# Altium PCB CH32V4x7V-R0.PcbDoc (part 2 of 3)
Units mm, origin at the board's own origin, x right, y up, seen from the top; angles counter-clockwise.
Board outline 106.4 x 69.09 mm, 2 copper layers (Top Layer, Bottom Layer); 78 components, 117 nets, 431 pads, 740 vias.
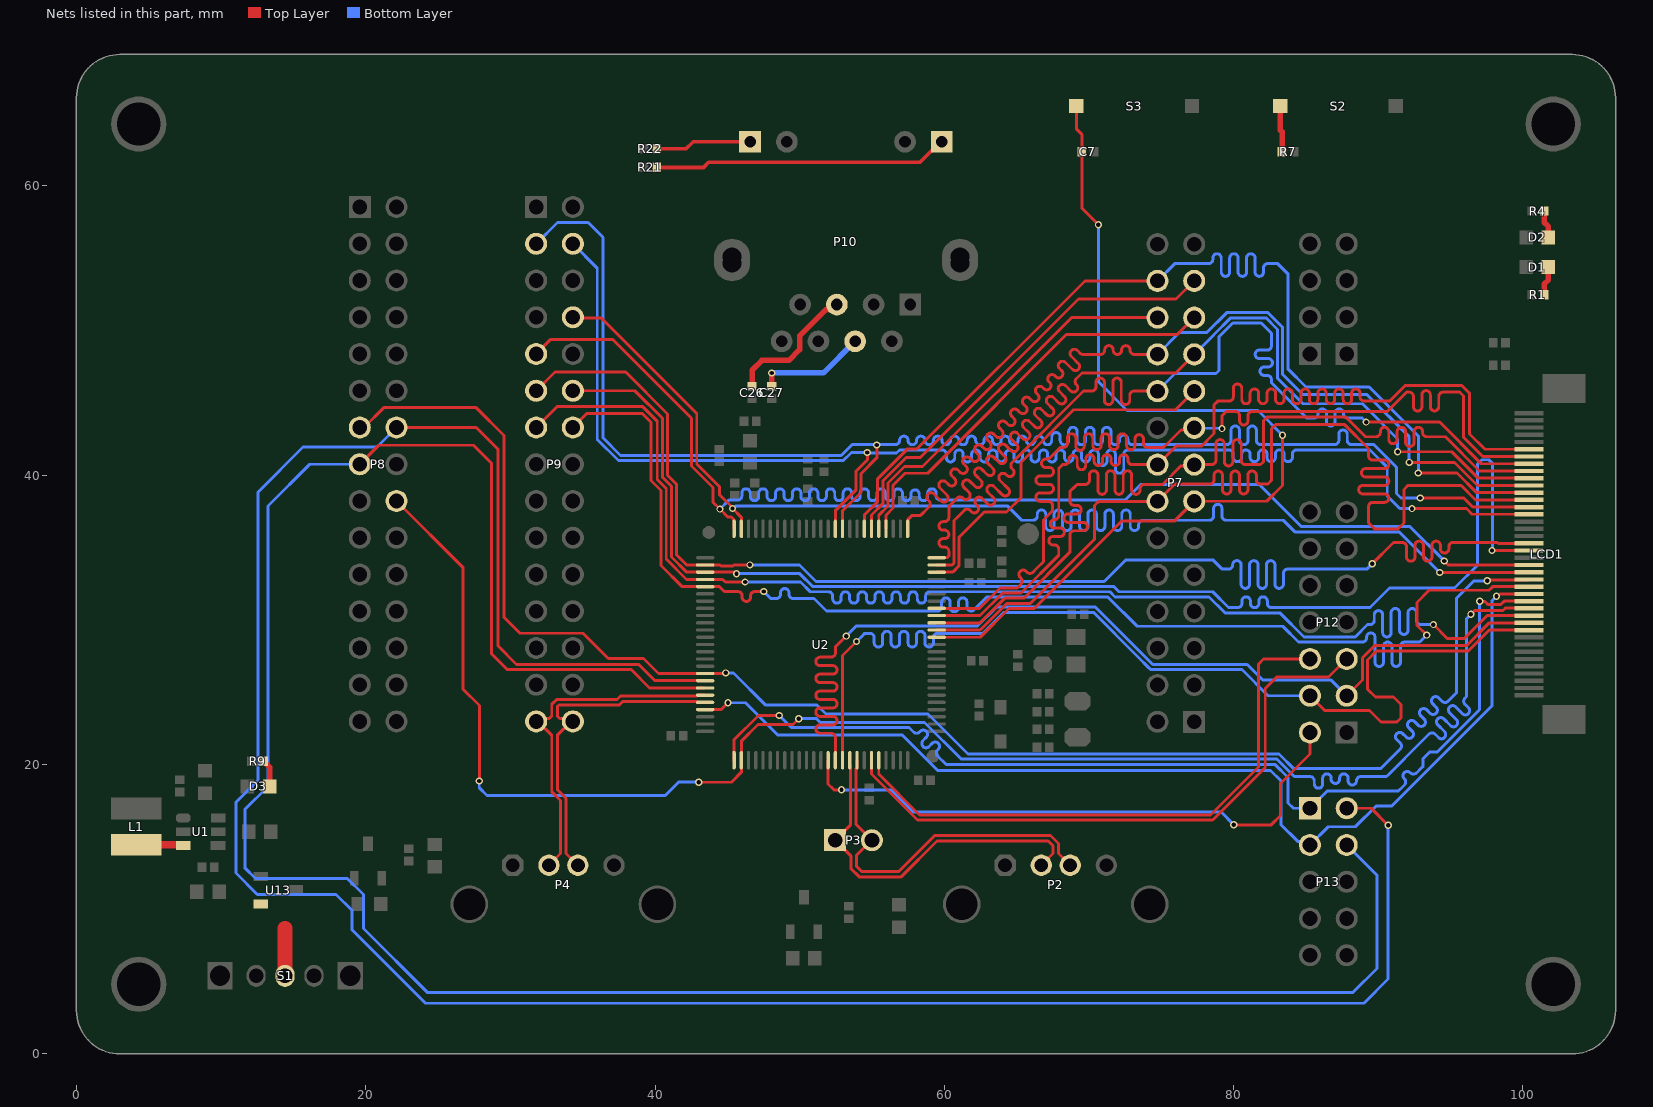
[diagram p2: the nets of this part, all layers, seen from the top]

## Via types
v1: diameter 0.5, hole 0.3, Top Layer to Bottom Layer, tented both sides, 735 vias
v2: diameter 0.7, hole 0.4, Top Layer to Bottom Layer, tented both sides, 5 vias

## Nets (pads, with @x,y where several pads share a name; then routed paths per layer and width w, separated by ;. In a path a pad name is that pad's centre, name@x,y a point inside that pad or via, vN(x,y) a via of type N, cw(c..) or ccw(c..) an arc to the next point about the centre after c; other vN are vias at no path point) (continued)
NetC26_2: C26.2 P10.5 | length 9.4
  Top Layer w0.381: C26.2@46.702,46.143 46.702,47.257 47.378,47.934 49.246,47.934 49.995,48.682 49.995,49.635 51.809,51.45 51.911,51.45 52.262,51.801 P10.5@52.565,51.801
NetC27_2: C27.2 P10.4 | length 7.6
  Top Layer w0.381: C27.2@48.055,46.143 48.055,47.064 v1(48.061,47.07)
  Bottom Layer w0.381: v1(48.061,47.07) 51.644,47.07 P10.4@53.835,49.261
NetD1_1: D1.1 R1.2 | length 2
  Top Layer w0.381: R1.2@101.463,52.477 101.463,53.21 101.758,53.506 D1.1@101.758,54.392
NetD2_1: D2.1 R4.2 | length 1.9
  Top Layer w0.381: R4.2@101.463,58.264 101.463,57.49 101.758,57.194 D2.1@101.758,56.437
NetD3_2: D3.2 R9.1 | length 1.9
  Top Layer w0.381: R9.1@12.958,20.238 12.958,20.213 13.35,19.821 D3.2@13.35,18.492
NetL1_1: L1.1 U1.3 | length 3.5
  Top Layer w0.508: L1.1@4.13,14.895 4.577,14.448 7.348,14.448 U1.3@7.394,14.402
NetP10_9: P10.9 R21.2 | length 20.6
  Top Layer w0.254: R21.2@40.004,61.278 43.353,61.278 43.703,61.628 58.312,61.628 59.114,62.43 59.197,62.43 59.762,62.995 P10.9@59.762,63.078
NetP10_12: P10.12 R22.2 | length 7
  Top Layer w0.254: R22.2@40.108,62.562 42.147,62.562 42.638,63.053 P10.12@46.57,63.053 P10.12@46.325,62.808
NetR7_2: R7.2 S2.2 | length 3.2
  Top Layer w0.381: S2.2@83.216,65.525 83.216,63.858 83.342,63.732 R7.2@83.342,62.35
NetS1_1: S1.1 U13.2 | length 3.3
  Top Layer w1.016: S1.1@14.421,5.392 14.421,8.678
NRST: C7.2 P7.13 S3.2 U2.14 | length 65.7
  Top Layer w0.203: U2.14@59.464,28.798 62.479,28.798 64.472,30.791 66.217,30.791 72.276,36.85 75.928,36.85 77.279,38.202 82.291,38.202 83.377,39.287 v1(83.377,42.771) ; S3.2@69.119,65.525 69.119,63.949 69.499,63.569 C7.2@69.499,62.35 69.525,62.325 69.525,58.432 v1(70.648,57.309)
  Bottom Layer w0.203: v1(70.648,57.309) 70.648,46.459 72.632,44.475 81.672,44.475 v1(83.377,42.771)
PA0: P7.19 U2.23 | length 25.6
  Top Layer w0.203: U2.23@59.464,33.298 60.576,33.298 61.018,33.74 61.018,35.713 62.755,37.45 64.301,37.45 65.296,38.445 65.296,39.99 65.296,40.89 68.931,44.525 75.982,44.525 P7.19@77.272,45.815
PA1: LCD1.33 P7.20 U2.24 | length 74.5
  Top Layer w0.203: U2.24@59.464,33.798 60.539,33.798 60.663,33.922 60.663,36.862 60.886,37.086 61.371,37.571 cw(c61.578,37.364) 61.784,37.571 61.872,37.483 ccw(c62.079,37.689) 62.285,37.483 ccw(c62.079,37.689) 62.285,37.896 62.197,37.984 cw(c62.404,38.19) 62.197,38.397 cw(c62.404,38.19) 62.611,38.397 62.995,38.012 ccw(c63.202,38.218) 63.409,38.012 ccw(c63.202,38.218) 63.409,38.425 63.024,38.81 cw(c63.23,39.016) 63.024,39.223 cw(c63.23,39.016) 63.437,39.223 64.004,38.655 ccw(c64.211,38.862) 64.417,38.655 ccw(c64.211,38.862) 64.417,39.069 63.85,39.636 cw(c64.056,39.843) 63.85,40.049 cw(c64.056,39.843) 64.263,40.049 64.32,39.992 ccw(c64.527,40.198) 64.733,39.992 ccw(c64.527,40.198) 64.733,40.405 64.676,40.462 cw(c64.883,40.669) 64.676,40.875 65.081,41.28 69.615,45.815 70.084,45.815 70.185,45.815 ccw(c70.185,46.107) 70.477,46.107 70.477,46.425 cw(c70.769,46.425) 71.061,46.425 71.061,45.173 ccw(c71.354,45.173) 71.646,45.173 71.646,46.425 cw(c71.938,46.425) 72.23,46.425 72.23,45.173 ccw(c72.522,45.173) 72.814,45.173 72.814,45.523 cw(c73.106,45.523) 73.106,45.815 P7.20@74.732,45.815 ; v1(89.154,43.672) 94.24,43.672 97.116,40.795 LCD1.33@100.428,40.795
  Bottom Layer w0.203: P7.20@74.732,45.815 75.953,47.036 78.784,47.036 78.992,47.244 78.992,49.577 79.939,50.524 81.9,50.524 82.612,49.812 82.612,49.63 82.612,48.944 cw(c82.32,48.944) 82.32,48.652 81.779,48.652 ccw(c81.779,48.36) 81.779,48.067 82.386,48.067 cw(c82.386,47.775) 82.386,47.483 82.112,47.483 ccw(c82.112,47.191) 82.112,46.899 82.32,46.899 cw(c82.32,46.607) 82.612,46.607 82.612,46.391 83.255,45.748 85.049,43.954 85.439,43.954 85.54,43.954 ccw(c85.54,44.246) 85.832,44.246 85.832,44.293 cw(c86.124,44.293) 86.417,44.293 86.417,43.694 ccw(c86.709,43.694) 87.001,43.694 87.001,44.293 cw(c87.293,44.293) 87.585,44.293 87.585,44.246 ccw(c87.877,44.246) 87.877,43.954 88.887,43.954 88.914,43.927 89.154,43.687 v1(89.154,43.672)
PA2: LCD1.31 P7.21 U2.25 | length 74.5
  Top Layer w0.203: U2.25@59.464,34.298 60.188,34.298 60.307,34.417 60.307,34.641 60.307,34.743 ccw(c60.015,34.743) 60.015,35.035 59.913,35.035 cw(c59.913,35.327) 59.913,35.619 60.015,35.619 ccw(c60.015,35.911) 60.015,36.203 59.913,36.203 cw(c59.913,36.495) 59.913,36.787 60.015,36.787 ccw(c60.015,37.079) 60.307,37.079 60.307,37.633 60.307,37.858 60.38,37.931 60.865,38.416 cw(c61.072,38.21) 61.278,38.416 61.29,38.405 ccw(c61.496,38.611) 61.703,38.405 ccw(c61.496,38.611) 61.703,38.818 61.346,39.175 cw(c61.553,39.381) 61.346,39.588 cw(c61.553,39.381) 61.759,39.588 62.116,39.231 ccw(c62.322,39.438) 62.529,39.231 ccw(c62.322,39.438) 62.529,39.644 62.172,40.001 cw(c62.379,40.207) 62.172,40.414 cw(c62.379,40.207) 62.585,40.414 62.942,40.057 ccw(c63.149,40.264) 63.355,40.057 ccw(c63.149,40.264) 63.355,40.47 62.999,40.827 cw(c63.205,41.033) 62.999,41.24 cw(c63.205,41.033) 63.412,41.24 63.768,40.883 ccw(c63.975,41.09) 64.181,40.883 ccw(c63.975,41.09) 64.181,41.297 63.825,41.653 cw(c64.031,41.86) 63.825,42.066 cw(c64.031,41.86) 64.238,42.066 64.594,41.71 ccw(c64.801,41.916) 65.007,41.71 ccw(c64.801,41.916) 65.007,42.123 64.651,42.479 cw(c64.857,42.686) 64.651,42.892 cw(c64.857,42.686) 65.064,42.892 65.421,42.536 ccw(c65.627,42.742) 65.834,42.536 ccw(c65.627,42.742) 65.834,42.949 65.477,43.305 cw(c65.684,43.512) 65.477,43.719 cw(c65.684,43.512) 65.89,43.719 66.247,43.362 ccw(c66.453,43.569) 66.66,43.362 ccw(c66.453,43.569) 66.66,43.775 66.303,44.132 cw(c66.51,44.338) 66.303,44.545 cw(c66.51,44.338) 66.716,44.545 67.073,44.188 ccw(c67.279,44.395) 67.486,44.188 ccw(c67.279,44.395) 67.486,44.601 67.129,44.958 cw(c67.336,45.164) 67.129,45.371 cw(c67.336,45.164) 67.543,45.371 67.899,45.014 ccw(c68.106,45.221) 68.312,45.014 ccw(c68.106,45.221) 68.312,45.427 67.956,45.784 cw(c68.162,45.991) 67.956,46.197 cw(c68.162,45.991) 68.369,46.197 68.725,45.841 ccw(c68.932,46.047) 69.138,45.841 ccw(c68.932,46.047) 69.138,46.254 69.127,46.265 cw(c69.334,46.471) 69.127,46.678 69.522,47.073 70.046,47.073 75.99,47.073 P7.21@77.272,48.355 ; v1(91.333,41.624) 95.079,41.624 96.908,39.795 LCD1.31@100.428,39.795
  Bottom Layer w0.203: P7.21@77.272,48.355 78.637,49.72 78.637,49.725 79.792,50.88 82.228,50.88 83.034,50.074 83.034,46.7 84.793,44.941 88.896,44.941 91.333,42.504 v1(91.333,41.624)
PA3: LCD1.30 P7.22 U2.26 | length 74.4
  Top Layer w0.203: U2.26@57.464,36.298 57.469,36.303 57.469,36.925 57.774,37.23 58.36,37.23 58.868,37.738 58.94,37.81 ccw(c58.734,38.016) 58.94,38.223 58.867,38.296 cw(c59.073,38.503) 58.867,38.709 cw(c59.073,38.503) 59.28,38.709 59.761,38.228 ccw(c59.968,38.435) 60.174,38.228 ccw(c59.968,38.435) 60.174,38.641 59.697,39.119 cw(c59.903,39.325) 59.697,39.532 cw(c59.903,39.325) 60.11,39.532 60.297,39.344 ccw(c60.504,39.551) 60.71,39.344 ccw(c60.504,39.551) 60.71,39.757 60.523,39.945 cw(c60.729,40.152) 60.523,40.358 cw(c60.729,40.152) 60.936,40.358 61.087,40.207 ccw(c61.293,40.414) 61.5,40.207 ccw(c61.293,40.414) 61.5,40.62 61.349,40.771 cw(c61.556,40.978) 61.349,41.184 cw(c61.556,40.978) 61.762,41.184 61.913,41.033 ccw(c62.119,41.24) 62.326,41.033 ccw(c62.119,41.24) 62.326,41.447 62.175,41.597 cw(c62.382,41.804) 62.175,42.01 cw(c62.382,41.804) 62.588,42.01 62.739,41.86 ccw(c62.946,42.066) 63.152,41.86 ccw(c62.946,42.066) 63.152,42.273 63.001,42.424 cw(c63.208,42.63) 63.001,42.837 cw(c63.208,42.63) 63.414,42.837 63.565,42.686 ccw(c63.772,42.892) 63.978,42.686 ccw(c63.772,42.892) 63.978,43.099 63.828,43.25 cw(c64.034,43.456) 63.828,43.663 cw(c64.034,43.456) 64.241,43.663 64.391,43.512 ccw(c64.598,43.719) 64.805,43.512 ccw(c64.598,43.719) 64.805,43.925 64.654,44.076 cw(c64.86,44.282) 64.654,44.489 cw(c64.86,44.282) 65.067,44.489 65.218,44.338 ccw(c65.424,44.545) 65.631,44.338 ccw(c65.424,44.545) 65.631,44.751 65.48,44.902 cw(c65.686,45.109) 65.48,45.315 cw(c65.686,45.109) 65.893,45.315 66.044,45.164 ccw(c66.25,45.371) 66.457,45.164 ccw(c66.25,45.371) 66.457,45.577 66.384,45.65 cw(c66.591,45.857) 66.384,46.063 cw(c66.591,45.857) 66.797,46.063 66.87,45.991 ccw(c67.077,46.197) 67.283,45.991 ccw(c67.077,46.197) 67.283,46.404 67.23,46.457 cw(c67.437,46.663) 67.23,46.87 cw(c67.437,46.663) 67.643,46.87 67.696,46.817 ccw(c67.903,47.023) 68.109,46.817 ccw(c67.903,47.023) 68.109,47.23 67.955,47.384 cw(c68.161,47.591) 67.955,47.797 cw(c68.161,47.591) 68.368,47.797 68.849,47.316 ccw(c69.056,47.523) 69.262,47.316 ccw(c69.056,47.523) 69.262,47.729 68.781,48.21 cw(c68.988,48.417) 68.781,48.623 cw(c68.988,48.417) 69.194,48.623 69.378,48.44 ccw(c69.584,48.647) 69.584,48.355 70.485,48.355 70.691,48.355 70.793,48.355 ccw(c70.793,48.647) 71.085,48.647 71.085,48.67 cw(c71.377,48.67) 71.669,48.67 71.669,48.645 ccw(c71.961,48.645) 72.253,48.645 72.253,48.67 cw(c72.545,48.67) 72.837,48.67 72.837,48.647 ccw(c73.13,48.647) 73.13,48.355 73.654,48.355 P7.22@74.732,48.355 ; v1(92.131,40.889) 95.265,40.889 96.859,39.295 LCD1.30@100.428,39.295
  Bottom Layer w0.203: P7.22@74.732,48.355 76.256,49.879 78.162,49.879 79.519,51.235 82.375,51.235 83.39,50.221 83.39,46.968 84.772,45.586 89.198,45.586 92.131,42.653 v1(92.131,40.889)
PA4: P7.23 U2.29 | length 28.8
  Top Layer w0.203: U2.29@55.964,36.298 55.964,37.237 56.456,37.729 56.456,39.312 57.282,40.138 58.845,40.138 68.429,49.723 76.1,49.723 P7.23@77.272,50.895
PA5: P7.24 U2.30 | length 26.8
  Top Layer w0.203: U2.30@55.464,36.298 55.464,37.24 56.101,37.876 56.101,39.459 57.25,40.609 58.497,40.609 68.782,50.895 P7.24@74.732,50.895
PA6: P7.25 U2.31 | length 30.9
  Top Layer w0.203: U2.31@54.96,36.293 U2.31@54.964,36.298 54.964,37.243 55.745,38.023 55.745,39.607 57.355,41.216 58.309,41.216 69.268,52.176 76.013,52.176 P7.25@77.272,53.435
PA7: LCD1.29 P7.26 U2.32 | length 74.6
  Top Layer w0.203: U2.32@54.464,36.298 54.464,37.246 55.39,38.171 55.39,39.754 57.435,41.799 58.078,41.799 69.713,53.435 P7.26@74.732,53.435 ; v1(92.766,40.154) 95.444,40.154 96.803,38.795 LCD1.29@100.428,38.795
  Bottom Layer w0.203: P7.26@74.732,53.435 75.924,54.627 78.163,54.627 78.265,54.627 ccw(c78.265,54.919) 78.557,54.919 78.557,55.02 cw(c78.849,55.02) 79.141,55.02 79.141,54.043 ccw(c79.433,54.043) 79.725,54.043 79.725,55.02 cw(c80.018,55.02) 80.31,55.02 80.31,54.043 ccw(c80.602,54.043) 80.894,54.043 80.894,55.02 cw(c81.186,55.02) 81.478,55.02 81.478,54.043 ccw(c81.77,54.043) 82.062,54.043 82.062,54.335 cw(c82.354,54.335) 82.354,54.627 82.876,54.627 83.048,54.627 83.745,53.929 83.745,47.354 84.993,46.106 89.368,46.106 92.766,42.708 v1(92.766,40.154)
PA8: LCD1.17 P8.13 U2.67 | length 113.8
  Top Layer w0.203: P8.13@19.588,43.3 19.884,43.3 21.252,44.668 27.634,44.668 29.558,42.744 29.558,30.18 30.663,29.076 35.025,29.076 36.768,27.333 39.207,27.333 40.242,26.298 U2.67@43.464,26.298 43.469,26.303 44.855,26.303 v1(44.889,26.337) ; v1(97.527,32.703) 97.573,32.749 100.382,32.749 LCD1.17@100.428,32.795
  Bottom Layer w0.203: v1@44.889,26.33 45.431,26.33 47.658,24.103 51.2,24.103 51.812,23.491 58.871,23.491 61.636,20.726 83.14,20.726 84.155,19.712 90.157,19.712 91.443,20.998 91.515,21.07 ccw(c91.309,21.276) 91.515,21.483 91.276,21.722 cw(c91.482,21.929) 91.276,22.135 cw(c91.482,21.929) 91.689,22.135 91.928,21.896 ccw(c92.135,22.103) 92.341,21.896 ccw(c92.135,22.103) 92.341,22.309 92.102,22.548 cw(c92.308,22.755) 92.102,22.962 cw(c92.308,22.755) 92.515,22.962 92.754,22.722 ccw(c92.961,22.929) 93.167,22.722 ccw(c92.961,22.929) 93.167,23.135 92.928,23.375 cw(c93.135,23.581) 92.928,23.788 cw(c93.135,23.581) 93.341,23.788 93.581,23.548 ccw(c93.787,23.755) 93.994,23.548 ccw(c93.787,23.755) 93.994,23.962 93.754,24.201 cw(c93.961,24.407) 93.754,24.614 cw(c93.961,24.407) 94.167,24.614 94.407,24.375 ccw(c94.613,24.581) 94.82,24.375 95.195,24.75 95.404,24.959 95.404,31.502 96.605,32.703 v1(97.527,32.703)
PA9: P8.14 P13.2 U2.68 | length 173.8
  Top Layer w0.203: P8.14@22.128,43.3 27.634,43.3 29.134,41.8 29.134,28.205 30.422,26.917 38.879,26.917 39.998,25.798 U2.68@43.464,25.798 ; P13.2@87.813,16.978 89.508,16.978 v1(90.678,15.808)
  Bottom Layer w0.203: P8.14@22.128,43.3 20.772,41.943 15.662,41.943 12.549,38.83 12.549,18.919 11.023,17.393 11.023,12.503 12.506,11.019 17.952,11.019 19.044,9.927 19.044,8.577 24.124,3.497 89.008,3.497 90.678,5.167 v1(90.678,15.808)
PA10: P8.15 P13.4 U2.69 | length 165.6
  Top Layer w0.203: P8.15@19.588,40.76 20.903,42.074 27.446,42.074 28.688,40.832 28.688,27.654 29.781,26.561 38.362,26.561 39.625,25.298 U2.69@43.464,25.298
  Bottom Layer w0.203: P8.15@19.588,40.76 16.126,40.76 13.247,37.882 13.247,18.492 11.639,16.883 11.639,12.858 12.372,12.125 18.722,12.125 19.84,11.007 19.84,8.664 24.252,4.253 88.254,4.253 89.899,5.898 89.899,12.353 P13.4@87.813,14.438
PA11: P4.2 P9.29 U2.70 | length 23.8
  Top Layer w0.203: P9.29@31.78,22.98 P9.29@31.904,22.98 ; P4.2@32.662,13.039 33.472,13.849 33.472,17.506 32.86,18.118 32.86,22.024 P9.29@31.904,22.98 ; U2.70@43.464,24.798 42.937,24.798 42.877,24.739 37.603,24.739 37.368,24.503 33.202,24.503 32.86,24.161 32.86,23.351 32.685,23.176 32.325,23.176 32.129,22.98 P9.29@31.904,22.98
PA12: P4.3 P9.30 U2.71 | length 23.2
  Top Layer w0.203: P9.30@34.32,22.98 P9.30@34.197,22.98 ; P4.3@34.662,13.039 33.853,13.849 33.853,17.664 33.241,18.276 33.241,22.024 P9.30@34.197,22.98 ; U2.71@43.464,24.298 42.937,24.298 42.877,24.358 37.761,24.358 37.525,24.122 33.36,24.122 33.241,24.003 33.241,23.351 33.416,23.176 34.002,23.176 P9.30@34.197,22.98
PA13: LCD1.15 P13.3 U2.72 | length 74.5
  Top Layer w0.203: U2.72@43.464,23.798 44.572,23.798 45.044,24.27 v1(45.044,24.273) ; v1(98.17,31.631) 98.25,31.631 98.414,31.795 LCD1.15@100.428,31.795
  Bottom Layer w0.203: v1(45.044,24.273) 46.249,24.273 48.477,22.046 57.089,22.046 59.538,19.597 82.551,19.597 83.257,18.891 83.257,15.855 84.422,14.69 85.021,14.69 P13.3@85.273,14.438 86.534,15.699 88.41,15.699 89.831,17.12 90.913,17.12 97.872,24.078 97.872,31.333 v1(98.17,31.631)
PA14: LCD1.14 P13.1 U2.76 | length 74.4
  Top Layer w0.203: U2.76@45.465,20.298 45.465,21.715 47.143,23.394 v1(48.583,23.394) ; v1(97.003,31.284) 97.015,31.273 97.37,31.273 97.567,31.076 98.483,31.076 98.702,31.295 LCD1.14@100.428,31.295
  Bottom Layer w0.203: v1(48.583,23.394) 49.419,22.557 57.563,22.557 57.803,22.318 57.875,22.246 ccw(c58.081,22.452) 58.288,22.246 58.337,22.295 cw(c58.544,22.089) 58.75,22.295 cw(c58.544,22.089) 58.75,21.882 58.524,21.655 ccw(c58.73,21.449) 58.524,21.242 ccw(c58.73,21.449) 58.937,21.242 59.163,21.469 cw(c59.37,21.262) 59.576,21.469 cw(c59.37,21.262) 59.576,21.056 59.527,21.007 ccw(c59.734,20.8) 59.527,20.594 60.106,20.015 82.846,20.015 83.762,19.099 83.762,17.348 84.131,16.978 P13.1@85.273,16.978 86.462,18.167 91.38,18.167 91.735,18.522 91.807,18.594 ccw(c91.601,18.801) 91.807,19.007 91.789,19.026 cw(c91.995,19.232) 91.789,19.439 cw(c91.995,19.232) 92.202,19.439 92.22,19.42 ccw(c92.427,19.627) 92.633,19.42 92.954,19.741 93.1,19.887 93.1,20.416 93.547,20.864 94.077,20.864 97.003,23.791 v1(97.003,31.284)
PA15: LCD1.13 P8.18 U2.77 | length 116.4
  Top Layer w0.203: P8.18@22.128,38.22 26.711,33.638 26.711,25.226 27.855,24.081 27.855,18.871 v1(27.848,18.863) ; v1(43.027,18.781) 43.031,18.777 45.278,18.777 45.964,19.464 U2.77@45.964,20.298 45.964,21.614 47.121,22.771 49.543,22.771 49.929,23.157 v1(49.929,23.17) ; v1(96.399,30.382) 96.4,30.382 96.666,30.648 98.619,30.648 98.806,30.835 100.388,30.835 LCD1.13@100.428,30.795
  Bottom Layer w0.203: v1(27.848,18.863) 27.848,18.389 28.375,17.862 40.702,17.862 41.621,18.781 v1(43.027,18.781) ; v1(49.929,23.17) 51.17,23.17 51.428,22.913 58.635,22.913 61.178,20.37 82.993,20.37 84.194,19.169 84.592,19.169 85.278,19.169 cw(c85.278,18.877) 85.57,18.877 85.57,18.655 ccw(c85.862,18.655) 86.154,18.655 86.154,19.064 cw(c86.447,19.064) 86.739,19.064 86.739,18.985 ccw(c87.031,18.985) 87.323,18.985 87.323,19.064 cw(c87.615,19.064) 87.907,19.064 87.907,18.877 ccw(c88.199,18.877) 88.491,18.877 cw(c88.783,18.877) 88.783,19.169 90.573,19.169 90.706,19.302 93.023,21.62 93.508,22.105 cw(c93.715,21.898) 93.921,22.105 94.161,21.865 ccw(c94.368,22.071) 94.574,21.865 ccw(c94.368,22.071) 94.574,22.278 94.107,22.746 cw(c94.313,22.952) 94.107,23.159 cw(c94.313,22.952) 94.52,23.159 94.988,22.691 ccw(c95.194,22.897) 95.401,22.691 ccw(c95.194,22.897) 95.401,23.104 94.933,23.572 cw(c95.139,23.778) 94.933,23.985 cw(c95.139,23.778) 95.346,23.985 95.814,23.517 ccw(c96.02,23.724) 96.227,23.517 ccw(c96.02,23.724) 96.227,23.93 95.987,24.17 cw(c96.193,24.377) 95.987,24.583 96.103,24.699 96.103,25.275 96.103,30.086 v1(96.399,30.382)
PB0: LCD1.27 P9.3 U2.35 | length 113.8
  Top Layer w0.203: U2.35@52.964,36.298 52.964,37.546 54.233,38.814 54.233,40.106 55.33,41.203 v1(55.33,42.088) ; v1(92.896,38.425) 95.904,38.425 96.533,37.795 LCD1.27@100.428,37.795
  Bottom Layer w0.203: P9.3@31.78,56 33.254,57.474 35.375,57.474 36.399,56.449 36.399,42.586 37.62,41.365 52.867,41.365 53.632,42.13 55.288,42.13 v1(55.33,42.088) 55.361,42.119 56.515,42.119 56.617,42.119 ccw(c56.617,42.411) 56.909,42.411 56.909,42.413 cw(c57.201,42.413) 57.493,42.413 57.493,42.398 ccw(c57.785,42.398) 58.077,42.398 58.077,42.413 cw(c58.37,42.413) 58.662,42.413 58.662,42.398 ccw(c58.954,42.398) 59.246,42.398 59.246,42.413 cw(c59.538,42.413) 59.83,42.413 59.83,42.398 ccw(c60.122,42.398) 60.414,42.398 60.414,42.413 cw(c60.706,42.413) 60.998,42.413 60.998,42.398 ccw(c61.291,42.398) 61.583,42.398 61.583,42.413 cw(c61.875,42.413) 62.167,42.413 62.167,42.398 ccw(c62.459,42.398) 62.751,42.398 62.751,42.413 cw(c63.043,42.413) 63.335,42.413 63.335,42.398 ccw(c63.627,42.398) 63.919,42.398 63.919,42.413 cw(c64.212,42.413) 64.504,42.413 64.504,42.398 ccw(c64.796,42.398) 65.088,42.398 65.088,42.413 cw(c65.38,42.413) 65.672,42.413 65.672,42.398 ccw(c65.964,42.398) 66.256,42.398 66.256,42.413 cw(c66.548,42.413) 66.84,42.413 66.84,42.398 ccw(c67.133,42.398) 67.425,42.398 67.425,42.664 cw(c67.717,42.664) 68.009,42.664 68.009,42.398 ccw(c68.301,42.398) 68.593,42.398 68.593,43.025 cw(c68.885,43.025) 69.177,43.025 69.177,42.398 ccw(c69.469,42.398) 69.761,42.398 69.761,43.025 cw(c70.054,43.025) 70.346,43.025 70.346,42.398 ccw(c70.638,42.398) 70.93,42.398 70.93,43.025 cw(c71.222,43.025) 71.514,43.025 71.514,42.398 ccw(c71.806,42.398) 72.098,42.398 72.098,42.485 cw(c72.39,42.485) 72.682,42.485 72.682,42.411 ccw(c72.975,42.411) 72.975,42.119 73.9,42.119 79.423,42.119 79.524,42.119 ccw(c79.524,42.411) 79.816,42.411 79.816,43.116 cw(c80.108,43.116) 80.4,43.116 80.4,42.398 ccw(c80.693,42.398) 80.985,42.398 80.985,43.116 cw(c81.277,43.116) 81.569,43.116 81.569,42.411 ccw(c81.861,42.411) 81.861,42.119 84.063,42.119 86.874,42.119 86.976,42.119 ccw(c86.976,42.411) 87.268,42.411 87.268,42.835 cw(c87.56,42.835) 87.852,42.835 87.852,42.411 ccw(c88.144,42.411) 88.144,42.119 89.685,42.119 91.256,40.548 91.256,38.73 91.562,38.425 92.365,38.425 v1(92.896,38.425)
PB1: LCD1.26 P9.4 U2.36 | length 108.2
  Top Layer w0.203: U2.36@52.464,36.298 52.464,37.548 53.877,38.961 53.877,40.253 54.676,41.051 v1(54.676,41.575) ; v1(92.33,37.694) 96.088,37.694 96.479,37.303 100.42,37.303 LCD1.26@100.428,37.295
  Bottom Layer w0.203: P9.4@34.32,56 36.005,54.316 36.005,42.477 37.473,41.009 53.014,41.009 53.58,41.575 v1(54.676,41.575) 54.718,41.533 56.693,41.533 56.911,41.751 59.156,41.751 59.842,41.751 cw(c59.842,41.459) 60.134,41.459 60.134,41.212 ccw(c60.426,41.212) 60.718,41.212 60.718,41.458 cw(c61.01,41.458) 61.302,41.458 61.302,41.212 ccw(c61.594,41.212) 61.886,41.212 61.886,41.458 cw(c62.178,41.458) 62.47,41.458 62.47,41.212 ccw(c62.763,41.212) 63.055,41.212 63.055,41.458 cw(c63.347,41.458) 63.639,41.458 63.639,41.212 ccw(c63.931,41.212) 64.223,41.212 64.223,41.458 cw(c64.515,41.458) 64.807,41.458 64.807,41.212 ccw(c65.099,41.212) 65.391,41.212 65.391,41.458 cw(c65.684,41.458) 65.976,41.458 65.976,41.212 ccw(c66.268,41.212) 66.56,41.212 66.56,41.458 cw(c66.852,41.458) 67.144,41.458 67.144,41.212 ccw(c67.436,41.212) 67.728,41.212 67.728,41.458 cw(c68.02,41.458) 68.312,41.458 68.312,41.212 ccw(c68.605,41.212) 68.897,41.212 68.897,41.458 cw(c69.189,41.458) 69.481,41.458 69.481,41.212 ccw(c69.773,41.212) 70.065,41.212 70.065,41.458 cw(c70.357,41.458) 70.649,41.458 70.649,40.966 ccw(c70.941,40.966) 71.233,40.966 71.233,41.458 cw(c71.526,41.458) 71.818,41.458 71.818,40.428 ccw(c72.11,40.428) 72.402,40.428 72.402,41.459 cw(c72.694,41.459) 72.694,41.751 73.172,41.751 78.989,41.751 79.675,41.751 cw(c79.675,41.459) 79.967,41.459 79.967,41.227 ccw(c80.259,41.227) 80.551,41.227 80.551,41.458 cw(c80.843,41.458) 81.135,41.458 81.135,41.227 ccw(c81.427,41.227) 81.719,41.227 81.719,41.471 cw(c82.012,41.471) 82.304,41.471 82.304,41.227 ccw(c82.596,41.227) 82.888,41.227 82.888,41.471 cw(c83.18,41.471) 83.472,41.471 83.472,41.227 ccw(c83.764,41.227) 84.056,41.227 84.056,41.459 cw(c84.348,41.459) 84.348,41.751 84.753,41.751 89.418,41.751 90.615,40.553 90.615,38.566 91.488,37.694 v1(92.33,37.694)
PB3: P12.2 U2.89 | length 40.9
  Top Layer w0.203: U2.89@51.964,20.298 51.964,18.65 52.363,18.252 v1(52.888,18.252) ; v1(80.012,15.835) 82.596,15.835 83.232,16.47 83.232,18.685 85.273,20.725 P12.2@85.273,22.218
  Bottom Layer w0.203: v1(52.888,18.252) 56.329,18.252 57.849,16.732 79.115,16.732 v1(80.012,15.835)
PB4: LCD1.11 P12.3 U2.90 | length 74.4
  Top Layer w0.203: U2.90@52.464,20.298 52.464,21.768 52.464,21.87 ccw(c52.172,21.87) 52.172,22.162 51.405,22.162 cw(c51.405,22.454) 51.405,22.746 52.294,22.746 ccw(c52.294,23.038) 52.294,23.33 51.405,23.33 cw(c51.405,23.622) 51.405,23.914 52.294,23.914 ccw(c52.294,24.207) 52.294,24.499 51.405,24.499 cw(c51.405,24.791) 51.405,25.083 52.294,25.083 ccw(c52.294,25.375) 52.294,25.667 51.405,25.667 cw(c51.405,25.959) 51.405,26.251 52.294,26.251 ccw(c52.294,26.543) 52.294,26.835 51.405,26.835 cw(c51.405,27.128) 51.405,27.42 52.172,27.42 ccw(c52.172,27.712) 52.464,27.712 52.464,28.125 52.552,28.212 v1(53.219,28.88) ; P12.3@87.813,24.758 88.902,25.848 88.902,27.375 89.742,28.215 96.09,28.215 97.67,29.795 LCD1.11@100.428,29.795
  Bottom Layer w0.203: v1(53.219,28.88) 53.91,29.57 62.289,29.57 63.599,30.88 70.45,30.88 73.716,27.614 74.408,26.922 80.931,26.922 82.02,25.833 86.738,25.833 P12.3@87.813,24.758
PB5: LCD1.10 P12.4 U2.91 | length 74.5
  Top Layer w0.203: U2.91@52.964,20.298 52.964,27.541 v1(53.931,28.508) ; P12.4@85.273,24.758 86.289,23.742 89.38,23.742 90.185,22.937 91.279,22.937 91.567,23.225 91.567,24.143 91.043,24.667 89.797,24.667 89.258,25.206 89.258,27.228 89.89,27.86 96.238,27.86 97.673,29.295 LCD1.10@100.428,29.295
  Bottom Layer w0.203: v1(53.931,28.508) 54.318,28.894 54.494,29.071 54.857,29.071 cw(c54.857,28.779) 55.15,28.779 55.15,28.412 ccw(c55.442,28.412) 55.734,28.412 55.734,28.923 cw(c56.026,28.923) 56.318,28.923 56.318,28.412 ccw(c56.61,28.412) 56.902,28.412 56.902,28.923 cw(c57.194,28.923) 57.486,28.923 57.486,28.412 ccw(c57.778,28.412) 58.071,28.412 58.071,28.923 cw(c58.363,28.923) 58.655,28.923 58.655,28.412 ccw(c58.947,28.412) 59.239,28.412 59.239,28.779 cw(c59.531,28.779) 59.531,29.071 60.6,29.071 62.686,29.071 64.14,30.524 70.302,30.524 73.36,27.466 74.164,26.663 74.261,26.566 80.572,26.566 82.38,24.758 P12.4@85.273,24.758
PB6: P2.2 P3.1 U2.92 | length 25.2
  Top Layer w0.203: U2.92@53.469,20.039 53.464,20.034 53.464,19.77 53.524,19.711 53.524,15.843 P3.1@52.451,14.77 53.531,13.69 53.531,12.822 54.116,12.236 57.016,12.236 59.494,14.714 67.178,14.714 67.508,14.384 67.508,13.849 P2.2@66.698,13.039
PB7: P2.3 P3.2 U2.93 | length 25.5
  Top Layer w0.203: U2.93@53.964,20.298 53.964,19.77 53.905,19.711 53.905,15.856 P3.2@54.991,14.77 54.978,14.77 53.912,13.704 53.912,12.98 54.274,12.617 56.859,12.617 59.336,15.095 67.335,15.095 67.889,14.541 67.889,13.849 P2.3@68.698,13.039
PB8: P12.5 U2.95 | length 43.5
  Top Layer w0.203: U2.95@54.96,20.83 54.964,20.826 54.964,19.34 58.143,16.162 78.548,16.162 82.181,19.794 82.181,25.252 82.971,26.043 86.558,26.043 P12.5@87.813,27.298
PB9: P12.6 U2.96 | length 40.6
  Top Layer w0.203: U2.96@55.464,20.298 55.464,19.343 58.291,16.517 78.401,16.517 81.708,19.824 81.708,26.938 82.068,27.298 P12.6@85.273,27.298
PB10: LCD1.18 P9.8 U2.49 | length 93.3
  Top Layer w0.203: P9.8@34.32,50.92 34.375,50.865 36.276,50.865 42.881,44.261 42.881,40.774 44.441,39.215 44.441,38.675 45.353,37.762 v1(45.353,37.703) ; v1@45.354,37.703 45.964,37.093 U2.49@45.964,36.298 ; v1(94.248,33.276) 94.258,33.286 100.418,33.286 LCD1.18@100.428,33.295
  Bottom Layer w0.203: v1(45.353,37.703) 45.434,37.703 45.615,37.884 64.353,37.884 65.349,36.887 66.029,36.887 66.131,36.887 ccw(c66.131,37.179) 66.423,37.179 66.423,37.313 cw(c66.715,37.313) 67.007,37.313 67.007,36.463 ccw(c67.299,36.463) 67.591,36.463 67.591,37.313 cw(c67.883,37.313) 68.175,37.313 68.175,36.463 ccw(c68.467,36.463) 68.759,36.463 68.759,37.313 cw(c69.052,37.313) 69.344,37.313 69.344,36.463 ccw(c69.636,36.463) 69.928,36.463 69.928,37.313 cw(c70.22,37.313) 70.512,37.313 70.512,36.463 ccw(c70.804,36.463) 71.096,36.463 71.096,37.313 cw(c71.388,37.313) 71.68,37.313 71.68,36.463 ccw(c71.973,36.463) 72.265,36.463 72.265,37.313 cw(c72.557,37.313) 72.849,37.313 72.849,36.463 ccw(c73.141,36.463) 73.433,36.463 73.433,36.595 cw(c73.725,36.595) 73.725,36.887 74.266,36.887 78.215,36.887 78.317,36.887 ccw(c78.317,37.179) 78.609,37.179 78.609,37.698 cw(c78.901,37.698) 79.193,37.698 79.193,37.179 ccw(c79.485,37.179) 79.485,36.887 80.97,36.887 83.429,36.887 84.23,36.086 91.438,36.086 v1(94.248,33.276)
PB11: LCD1.19 P9.9 U2.50 | length 94.9
  Top Layer w0.203: P9.9@31.78,48.38 32.796,49.396 37.05,49.396 42.514,43.932 42.514,40.638 44.007,39.146 44.007,38.134 v1(44.482,37.659) 45.027,37.114 45.264,37.114 45.452,36.927 45.452,36.838 45.465,36.826 U2.50@45.465,36.298 ; v1(94.555,34.07) 94.561,34.07 94.835,33.795 LCD1.19@100.428,33.795
  Bottom Layer w0.203: v1(44.482,37.659) 45.098,38.275 45.602,38.275 45.704,38.275 ccw(c45.704,38.567) 45.996,38.567 45.996,38.772 cw(c46.288,38.772) 46.58,38.772 46.58,38.531 ccw(c46.872,38.531) 47.164,38.531 47.164,38.772 cw(c47.456,38.772) 47.748,38.772 47.748,38.531 ccw(c48.04,38.531) 48.332,38.531 48.332,38.772 cw(c48.625,38.772) 48.917,38.772 48.917,38.531 ccw(c49.209,38.531) 49.501,38.531 49.501,38.772 cw(c49.793,38.772) 50.085,38.772 50.085,38.531 ccw(c50.377,38.531) 50.669,38.531 50.669,38.772 cw(c50.961,38.772) 51.253,38.772 51.253,38.531 ccw(c51.546,38.531) 51.838,38.531 51.838,38.772 cw(c52.13,38.772) 52.422,38.772 52.422,38.531 ccw(c52.714,38.531) 53.006,38.531 53.006,38.772 cw(c53.298,38.772) 53.59,38.772 53.59,38.531 ccw(c53.882,38.531) 54.174,38.531 54.174,38.772 cw(c54.467,38.772) 54.759,38.772 54.759,38.531 ccw(c55.051,38.531) 55.343,38.531 55.343,38.772 cw(c55.635,38.772) 55.927,38.772 55.927,38.531 ccw(c56.219,38.531) 56.511,38.531 56.511,38.772 cw(c56.803,38.772) 57.095,38.772 57.095,38.531 ccw(c57.388,38.531) 57.68,38.531 57.68,38.699 cw(c57.972,38.699) 58.264,38.699 58.264,38.531 ccw(c58.556,38.531) 58.848,38.531 58.848,38.772 cw(c59.14,38.772) 59.432,38.772 59.432,38.567 ccw(c59.724,38.567) 59.724,38.275 61.523,38.275 72.482,38.275 73.569,39.362 81.771,39.362 84.691,36.442 92.198,36.442 94.555,34.086 v1(94.555,34.07)
PB12: LCD1.22 P9.11 U2.52 | length 97.5
  Top Layer w0.203: P9.11@31.78,45.84 33.075,47.134 37.971,47.134 40.863,44.242 40.863,40.004 41.484,39.384 41.484,34.502 42.188,33.798 U2.52@43.464,33.798 44.498,33.798 44.575,33.721 45.369,33.721 45.451,33.802 v1(46.555,33.802) ; v1(89.585,33.888) 90.972,35.276 91.047,35.351 91.658,35.351 cw(c91.658,35.059) 91.95,35.059 91.95,34.345 ccw(c92.242,34.345) 92.534,34.345 92.534,35.153 cw(c92.826,35.153) 93.119,35.153 93.119,34.345 ccw(c93.411,34.345) 93.703,34.345 93.703,35.153 cw(c93.995,35.153) 94.287,35.153 94.287,34.917 ccw(c94.579,34.917) 94.871,34.917 94.871,35.059 cw(c95.163,35.059) 95.163,35.351 95.804,35.351 98.239,35.351 98.294,35.295 LCD1.22@100.428,35.295
  Bottom Layer w0.203: v1(46.555,33.802) 49.977,33.802 51.122,32.658 71.048,32.658 72.521,34.131 78.59,34.131 79.214,33.507 79.538,33.507 79.639,33.507 ccw(c79.639,33.799) 79.931,33.799 79.931,33.805 cw(c80.223,33.805) 80.516,33.805 80.516,32.467 ccw(c80.808,32.467) 81.1,32.467 81.1,33.805 cw(c81.392,33.805) 81.684,33.805 81.684,32.467 ccw(c81.976,32.467) 82.268,32.467 82.268,33.805 cw(c82.56,33.805) 82.852,33.805 82.852,32.467 ccw(c83.144,32.467) 83.437,32.467 83.437,33.215 cw(c83.729,33.215) 83.729,33.507 85.372,33.507 89.203,33.507 v1(89.585,33.888)
PB13: LCD1.21 P9.12 U2.53 | length 94.1
  Top Layer w0.203: P9.12@34.32,45.84 38.604,45.84 40.508,43.936 40.508,39.857 41.128,39.236 41.128,34.355 42.185,33.298 U2.53@43.464,33.298 45.448,33.298 45.549,33.197 v1(45.63,33.197) ; v1(97.863,34.796) LCD1.21@100.428,34.796
  Bottom Layer w0.203: v1(45.63,33.197) 50.007,33.197 50.901,32.302 71.715,32.302 72.071,31.946 78.555,31.946 79.647,30.854 80.179,30.854 80.28,30.854 ccw(c80.28,31.146) 80.572,31.146 80.572,31.305 cw(c80.864,31.305) 81.157,31.305 81.157,31.135 ccw(c81.449,31.135) 81.741,31.135 81.741,31.305 cw(c82.033,31.305) 82.325,31.305 82.325,31.146 ccw(c82.617,31.146) 82.617,30.854 83.354,30.854 89.426,30.854 90.767,32.195 95.262,32.195 96.87,33.803 96.87,40.775 97.166,41.071 97.636,41.071 97.907,40.799 97.907,34.779 v1@97.943,34.743
PB14: LCD1.12 P9.13 U2.54 | length 96.9
  Top Layer w0.203: P9.13@31.78,43.3 33.22,44.74 39.143,44.74 40.152,43.73 40.152,39.71 40.773,39.089 40.773,34.201 42.176,32.798 U2.54@43.464,32.798 44.674,32.798 44.858,32.614 v1(46.224,32.614) ; v1(93.808,29.673) 94.761,28.72 95.945,28.72 97.518,30.293 98.767,30.293 98.769,30.295 LCD1.12@100.428,30.295
  Bottom Layer w0.203: v1(46.224,32.614) 50.057,32.614 50.724,31.947 51.304,31.947 51.99,31.947 cw(c51.99,31.655) 52.282,31.655 52.282,31.448 ccw(c52.574,31.448) 52.866,31.448 52.866,31.655 cw(c53.158,31.655) 53.45,31.655 53.45,31.448 ccw(c53.742,31.448) 54.034,31.448 54.034,31.655 cw(c54.326,31.655) 54.619,31.655 54.619,31.448 ccw(c54.911,31.448) 55.203,31.448 55.203,31.655 cw(c55.495,31.655) 55.787,31.655 55.787,31.448 ccw(c56.079,31.448) 56.371,31.448 56.371,31.655 cw(c56.663,31.655) 56.955,31.655 56.955,31.448 ccw(c57.247,31.448) 57.54,31.448 57.54,31.655 cw(c57.832,31.655) 58.124,31.655 58.124,31.448 ccw(c58.416,31.448) 58.708,31.448 58.708,31.655 cw(c59,31.655) 59,31.947 60.306,31.947 71.448,31.947 71.804,31.591 78.293,31.591 79.396,30.488 83.186,30.488 84.852,28.822 88.402,28.822 89.253,29.673 89.324,29.673 89.425,29.673 ccw(c89.425,29.965) 89.717,29.965 89.717,30.351 cw(c90.009,30.351) 90.302,30.351 90.302,29.114 ccw(c90.594,29.114) 90.886,29.114 90.886,30.496 cw(c91.178,30.496) 91.47,30.496 91.47,29.284 ccw(c91.762,29.284) 92.054,29.284 92.054,30.496 cw(c92.346,30.496) 92.638,30.496 92.638,29.965 ccw(c92.93,29.965) 92.93,29.673 93.747,29.673 v1(93.808,29.673)
PB15: LCD1.16 P9.14 U2.55 | length 94.4
  Top Layer w0.203: P9.14@34.32,43.3 35.3,44.279 39.1,44.279 39.724,43.655 39.724,39.635 40.417,38.942 40.417,33.756 41.875,32.298 U2.55@43.464,32.298 44.451,32.298 44.79,31.96 45.042,31.96 45.728,31.96 cw(c45.728,31.667) 46.02,31.667 46.02,31.566 ccw(c46.312,31.566) 46.604,31.566 46.604,31.667 cw(c46.896,31.667) 46.896,31.96 47.494,31.96 v1(47.514,31.96) ; v1(93.34,28.948) 92.666,29.622 92.666,31.205 93.51,32.049 97.658,32.049 97.904,32.295 LCD1.16@100.428,32.295
  Bottom Layer w0.203: v1(47.514,31.96) 47.994,31.479 48.28,31.479 48.382,31.479 ccw(c48.382,31.771) 48.674,31.771 48.674,31.873 cw(c48.966,31.873) 49.258,31.873 49.258,31.771 ccw(c49.55,31.771) 49.55,31.479 50.915,31.479 50.981,31.479 51.848,30.612 57.082,30.612 59.52,30.612 ccw(c59.52,30.904) 59.812,30.904 59.812,31.232 cw(c60.104,31.232) 60.397,31.232 60.397,30.853 ccw(c60.689,30.853) 60.981,30.853 60.981,31.232 cw(c61.273,31.232) 61.565,31.232 61.565,30.904 ccw(c61.857,30.904) 61.857,30.612 61.958,30.612 62.926,31.579 62.938,31.591 71.3,31.591 73.333,29.559 83.396,29.559 84.476,28.479 84.693,28.479 84.705,28.466 88.792,28.466 88.894,28.466 ccw(c88.894,28.759) 89.186,28.759 89.186,28.811 cw(c89.478,28.811) 89.77,28.811 89.77,27.072 ccw(c90.062,27.072) 90.354,27.072 90.354,28.174 cw(c90.646,28.174) 90.939,28.174 90.939,27.072 ccw(c91.231,27.072) 91.523,27.072 91.523,28.174 cw(c91.815,28.174) 91.815,28.466 92.858,28.466 92.977,28.586 v1(93.34,28.948)
PC0: LCD1.28 P7.14 U2.15 | length 75.2
  Top Layer w0.203: U2.15@59.464,29.298 62.476,29.298 64.324,31.147 65.947,31.147 70.373,35.573 70.373,37.902 70.666,38.195 P7.14@74.732,38.195 75.928,39.391 78.249,39.391 78.35,39.391 ccw(c78.35,39.683) 78.642,39.683 78.642,40 cw(c78.934,40) 79.227,40 79.227,38.997 ccw(c79.519,38.997) 79.811,38.997 79.811,40 cw(c80.103,40) 80.395,40 80.395,38.997 ccw(c80.687,38.997) 80.979,38.997 80.979,40 cw(c81.271,40) 81.563,40 81.563,39.683 ccw(c81.855,39.683) 81.855,39.391 82.359,39.391 82.369,39.401 82.622,39.653 82.622,43.21 82.906,43.495 87.671,43.495 89.323,41.843 89.323,41.441 89.323,41.34 ccw(c89.615,41.34) 89.615,41.048 90.434,41.048 cw(c90.434,40.756) 90.434,40.463 89.121,40.463 ccw(c89.121,40.171) 89.121,39.879 90.434,39.879 cw(c90.434,39.587) 90.434,39.295 88.929,39.295 ccw(c88.929,39.003) 88.929,38.711 90.434,38.711 cw(c90.434,38.419) 90.434,38.127 89.615,38.127 ccw(c89.615,37.835) 89.323,37.835 89.323,37.054 89.323,36.716 89.745,36.295 91.367,36.295 91.768,36.696 91.768,39.023 92.029,39.284 95.726,39.284 96.714,38.295 LCD1.28@100.428,38.295
PC1: LCD1.32 P7.15 U2.16 | length 75.2
  Top Layer w0.203: U2.16@59.464,29.798 62.473,29.798 64.177,31.502 65.503,31.502 68.674,34.674 68.674,35.183 68.674,35.869 cw(c68.966,35.869) 68.966,36.161 69.594,36.161 ccw(c69.594,36.453) 69.594,36.745 68.554,36.745 cw(c68.554,37.037) 68.554,37.329 69.167,37.329 ccw(c69.167,37.621) 69.167,37.913 68.966,37.913 cw(c68.966,38.206) 68.674,38.206 68.674,38.869 69.01,39.205 69.172,39.368 69.636,39.368 69.737,39.368 ccw(c69.737,39.66) 70.029,39.66 70.029,40.019 cw(c70.321,40.019) 70.613,40.019 70.613,38.974 ccw(c70.906,38.974) 71.198,38.974 71.198,40.019 cw(c71.49,40.019) 71.782,40.019 71.782,38.974 ccw(c72.074,38.974) 72.366,38.974 72.366,40.019 cw(c72.658,40.019) 72.95,40.019 72.95,38.974 ccw(c73.242,38.974) 73.534,38.974 73.534,39.076 cw(c73.827,39.076) 73.827,39.368 74.89,39.368 75.085,39.368 76.368,40.651 77.188,40.651 P7.15@77.272,40.735 78.376,40.735 78.478,40.735 ccw(c78.478,41.027) 78.77,41.027 78.77,42.168 cw(c79.062,42.168) 79.354,42.168 79.354,40.935 ccw(c79.646,40.935) 79.938,40.935 79.938,42.168 cw(c80.23,42.168) 80.522,42.168 80.522,41.027 ccw(c80.814,41.027) 80.814,40.735 81.856,40.735 81.989,40.868 82.073,40.952 82.073,43.79 82.297,44.014 87.76,44.014 89.114,42.66 89.742,42.66 89.844,42.66 ccw(c89.844,42.952) 90.136,42.952 90.136,43.024 cw(c90.428,43.024) 90.72,43.024 90.72,42.471 ccw(c91.012,42.471) 91.304,42.471 91.304,43.024 cw(c91.596,43.024) 91.888,43.024 91.888,42.272 ccw(c92.181,42.272) 92.473,42.272 92.473,43.024 cw(c92.765,43.024) 93.057,43.024 93.057,42.952 ccw(c93.349,42.952) 93.349,42.66 94.202,42.66 94.637,42.66 97.002,40.295 LCD1.32@100.428,40.295
PC2: LCD1.35 P7.16 U2.17 | length 75.3
  Top Layer w0.203: U2.17@59.464,30.298 62.47,30.298 64.03,31.858 65.292,31.858 67.906,34.472 67.906,34.786 67.906,34.888 ccw(c67.614,34.888) 67.614,35.18 67.513,35.18 cw(c67.513,35.472) 67.513,35.764 68.004,35.764 ccw(c68.004,36.056) 68.004,36.349 67.614,36.349 cw(c67.614,36.641) 67.614,36.933 ccw(c67.614,37.225) 67.906,37.225 67.906,37.848 67.906,40.457 68.184,40.735 68.21,40.735 68.312,40.735 ccw(c68.312,41.027) 68.604,41.027 68.604,41.081 cw(c68.896,41.081) 69.188,41.081 69.188,40.67 ccw(c69.48,40.67) 69.772,40.67 69.772,41.128 cw(c70.064,41.128) 70.357,41.128 70.357,40.959 ccw(c70.649,40.959) 70.941,40.959 70.941,41.128 cw(c71.233,41.128) 71.525,41.128 71.525,40.959 ccw(c71.817,40.959) 72.109,40.959 72.109,41.128 cw(c72.401,41.128) 72.693,41.128 72.693,41.027 ccw(c72.985,41.027) 72.985,40.735 74.37,40.735 P7.16@74.732,40.735 74.953,40.735 74.953,40.956 76.008,42.011 77.766,42.011 78.643,42.887 78.643,44.866 78.894,45.118 79.581,45.118 79.683,45.118 ccw(c79.683,45.41) 79.975,45.41 79.975,46.02 cw(c80.267,46.02) 80.559,46.02 80.559,45.233 ccw(c80.851,45.233) 81.143,45.233 81.143,45.677 cw(c81.435,45.677) 81.727,45.677 81.727,45.233 ccw(c82.019,45.233) 82.312,45.233 82.312,45.677 cw(c82.604,45.677) 82.896,45.677 82.896,45.233 ccw(c83.188,45.233) 83.48,45.233 83.48,45.677 cw(c83.772,45.677) 84.064,45.677 84.064,45.233 ccw(c84.356,45.233) 84.648,45.233 84.648,45.677 cw(c84.94,45.677) 85.233,45.677 85.233,45.233 ccw(c85.525,45.233) 85.817,45.233 85.817,45.677 cw(c86.109,45.677) 86.401,45.677 86.401,45.233 ccw(c86.693,45.233) 86.985,45.233 86.985,45.677 cw(c87.277,45.677) 87.569,45.677 87.569,45.233 ccw(c87.861,45.233) 88.154,45.233 88.154,45.677 cw(c88.446,45.677) 88.738,45.677 88.738,45.41 ccw(c89.03,45.41) 89.03,45.118 90.138,45.118 90.767,45.118 91.855,46.205 95.769,46.205 96.301,45.673 96.301,42.859 97.365,41.795 LCD1.35@100.428,41.795
PC3: LCD1.34 P7.17 U2.18 | length 74.8
  Top Layer w0.203: U2.18@59.464,30.798 62.436,30.798 63.851,32.214 65.036,32.214 65.222,32.4 65.294,32.472 ccw(c65.088,32.679) 65.294,32.885 65.239,32.941 cw(c65.445,33.147) 65.239,33.354 cw(c65.445,33.147) 65.652,33.354 65.707,33.298 ccw(c65.914,33.505) 66.12,33.298 66.413,33.591 66.848,34.026 66.848,36.909 67.481,37.542 67.481,37.803 67.481,37.904 ccw(c67.189,37.904) 67.189,38.197 66.617,38.197 cw(c66.617,38.489) 66.617,38.781 67.259,38.781 ccw(c67.259,39.073) 67.259,39.365 66.617,39.365 cw(c66.617,39.657) 66.617,39.949 67.259,39.949 ccw(c67.259,40.241) 67.259,40.533 67.012,40.533 cw(c67.012,40.825) 67.012,41.118 67.087,41.118 ccw(c67.087,41.41) 67.293,41.203 67.947,41.857 68.01,41.92 68.111,41.92 68.213,41.92 ccw(c68.213,42.212) 68.505,42.212 68.505,42.579 cw(c68.797,42.579) 69.089,42.579 69.089,42.014 ccw(c69.381,42.014) 69.673,42.014 69.673,42.579 cw(c69.966,42.579) 70.258,42.579 70.258,42.061 ccw(c70.55,42.061) 70.842,42.061 70.842,42.579 cw(c71.134,42.579) 71.426,42.579 71.426,42.061 ccw(c71.718,42.061) 72.01,42.061 72.01,42.579 cw(c72.302,42.579) 72.594,42.579 72.594,42.061 ccw(c72.887,42.061) 73.179,42.061 73.179,42.515 cw(c73.471,42.515) 73.763,42.515 73.763,42.212 ccw(c74.055,42.212) 74.055,41.92 75.019,41.92 75.152,41.92 76.368,43.136 77.133,43.136 P7.17@77.272,43.275 ; v1(79.197,43.224) 79.197,44.116 79.429,44.347 79.491,44.41 80.114,44.41 cw(c80.114,44.118) 80.406,44.118 80.406,43.766 ccw(c80.699,43.766) 80.991,43.766 80.991,44.118 cw(c81.283,44.118) 81.283,44.41 82.019,44.41 90.615,44.41 91.593,45.388 91.947,45.742 92.133,45.742 cw(c92.133,45.45) 92.425,45.45 92.425,44.732 ccw(c92.717,44.732) 93.009,44.732 93.009,45.558 cw(c93.301,45.558) 93.593,45.558 93.593,44.738 ccw(c93.885,44.738) 94.177,44.738 94.177,45.45 cw(c94.469,45.45) 94.469,45.742 95.622,45.742 95.686,45.678 95.893,45.471 95.893,42.624 97.222,41.295 LCD1.34@100.428,41.295
  Bottom Layer w0.203: P7.17@77.272,43.275 77.297,43.249 79.172,43.249 v1(79.197,43.224)